# Altium PCB POD-Design-v1.0.PcbDoc (part 2 of 8)
Units mil, origin at the board's own origin, x right, y up, seen from the top; angles counter-clockwise.
Board outline 5511.81 x 3937.01 mil, 4 copper layers (Top Layer, Layer 1, Layer 2, Bottom Layer), stack 61.653 mil thick; 347 components, 252 nets, 1015 pads, 412 vias.
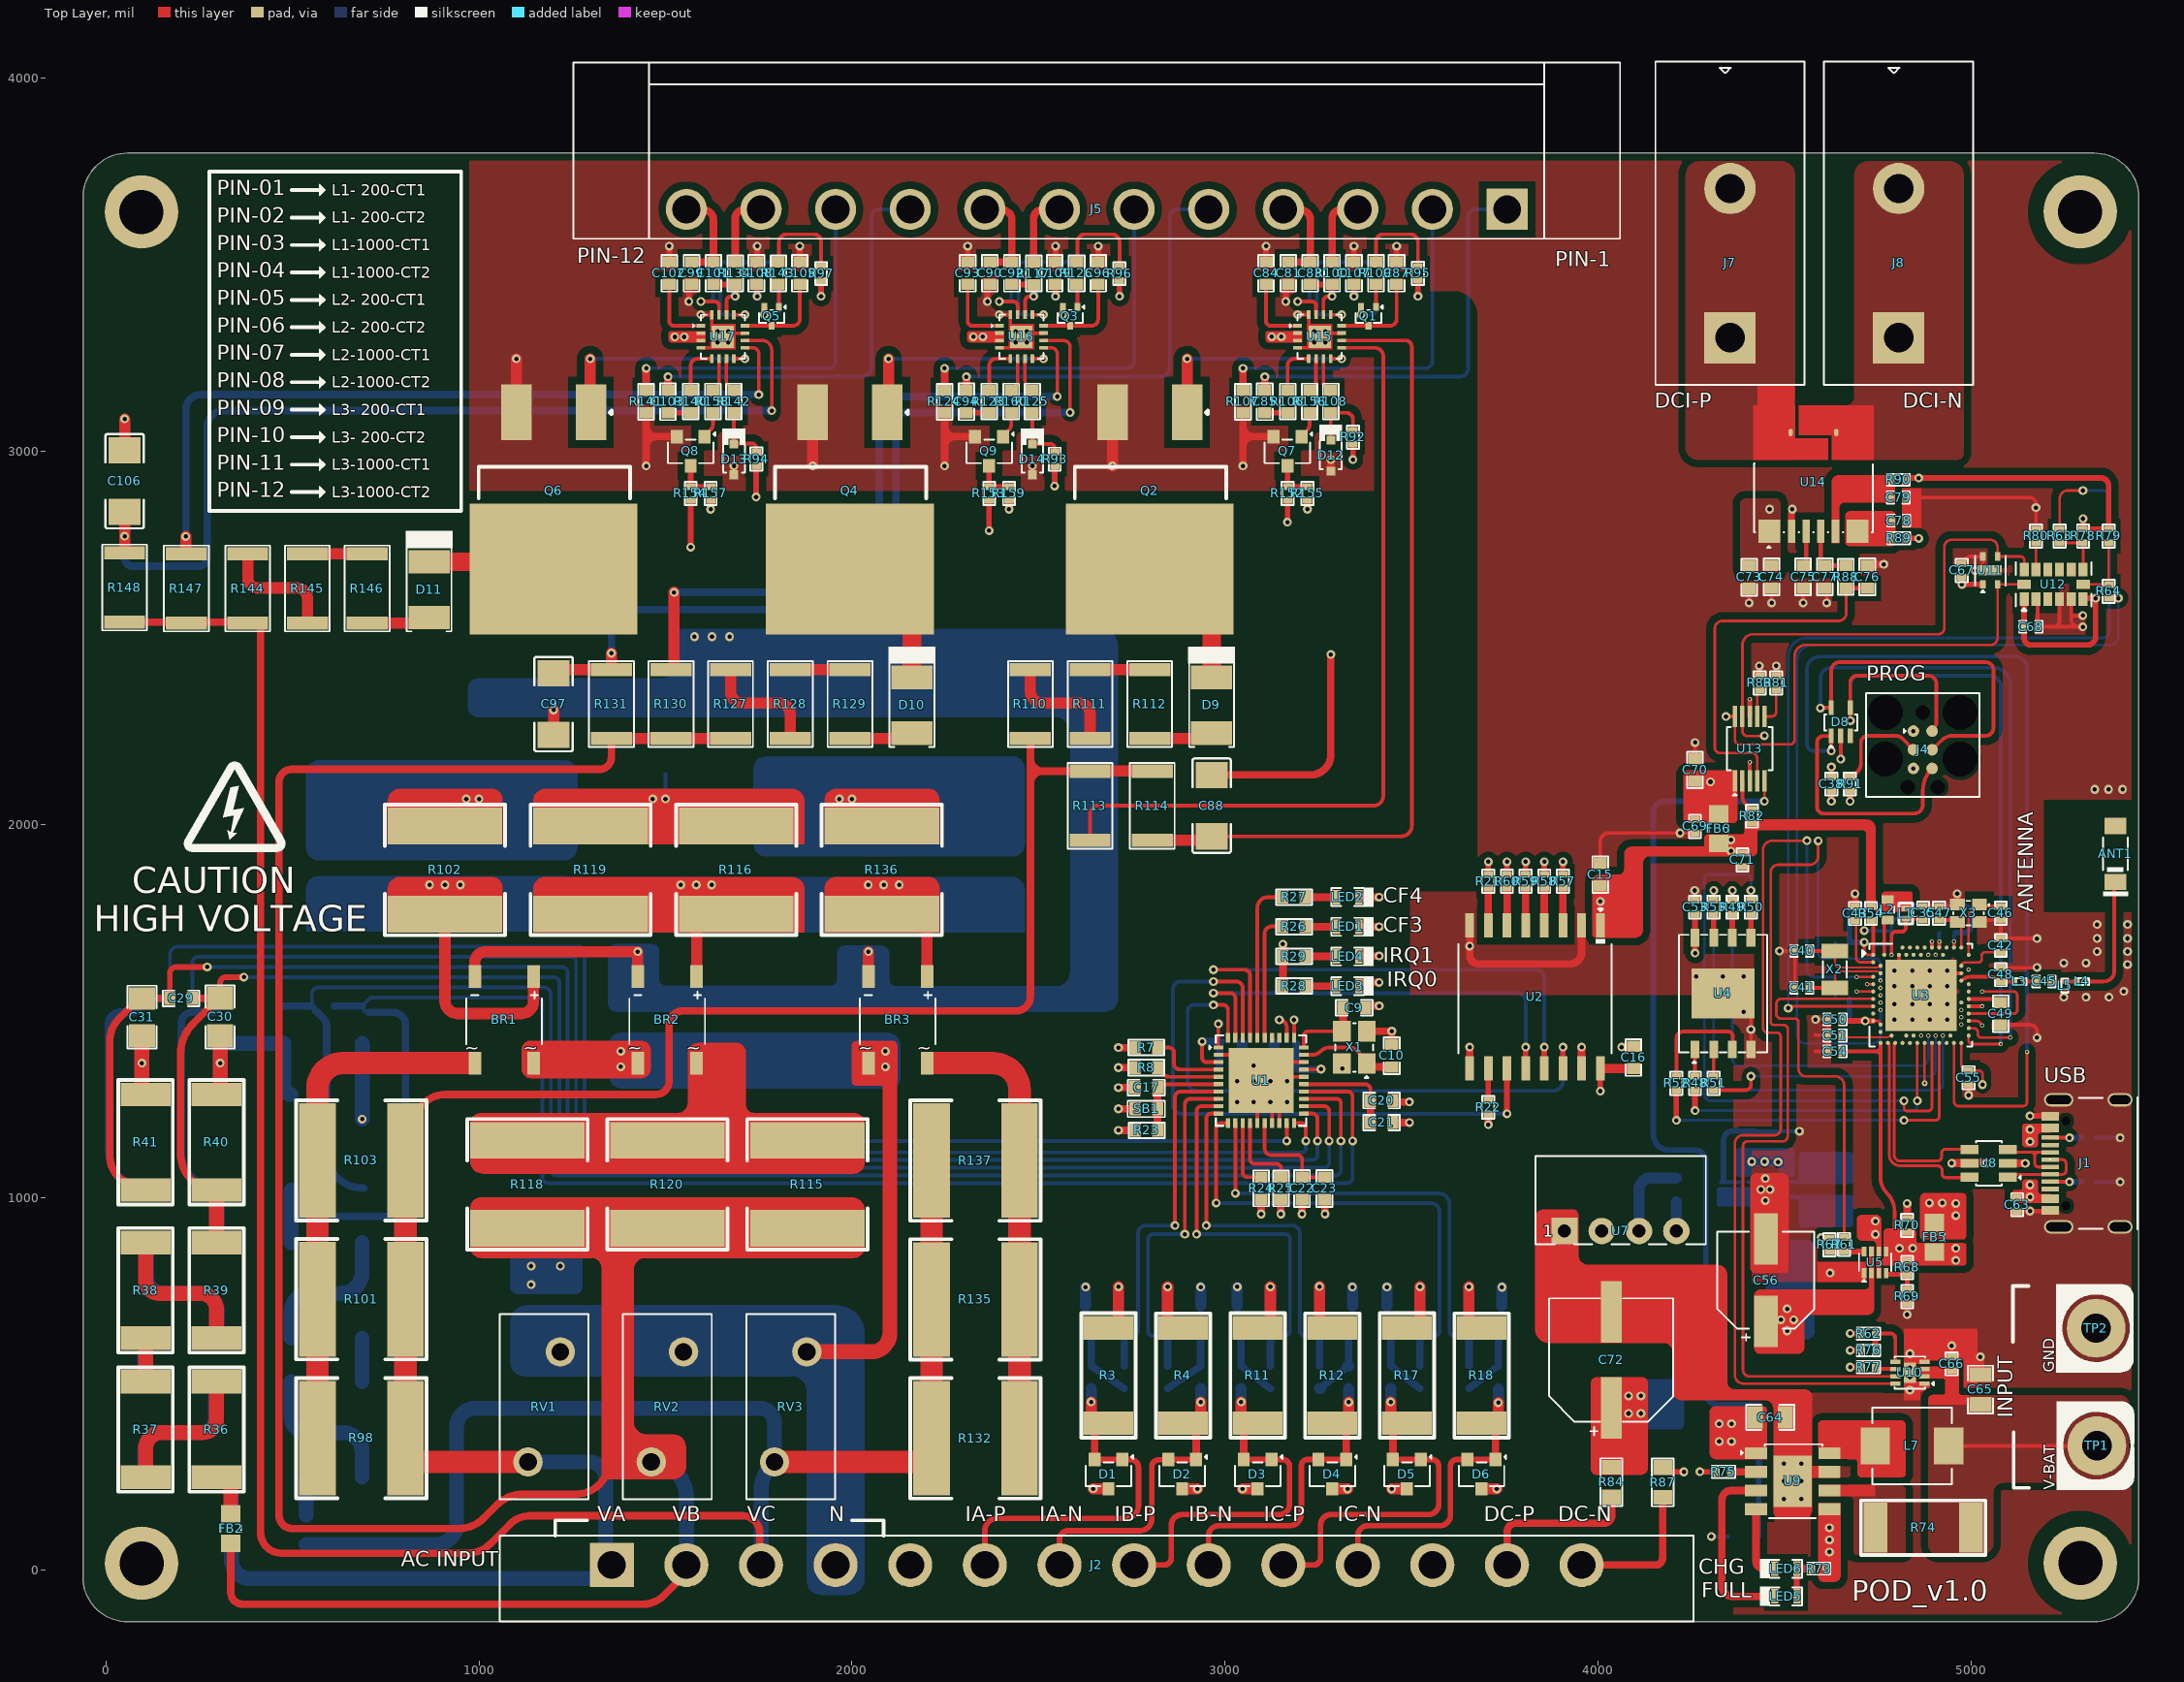
[diagram p0: Top Layer view]

## Part data (continued)
C35 C38: library part CC0402KRX5R7BB105, "CAP CER 1UF 16V X5R 0402", Case Code (Imperial)=0402, Case Code (Metric)=1005, Dielectric=X5R, LCSC Part Number=C325464, Manufacturer=Yageo, Max Operating Temperature=85°C, Min Operating Temperature=-55°C, Supplier Part Number 1=311-1691-6-ND, Tolerance=10%, Voltage Rating=16V, Capacitance=1uF, Case/Package=0402, ComponentLink1Description=http://www.yageo.com/documents/recent/UPY-GPHC_X5R_4V-to-50V_12.pdf?src-supplier=Avnet+Europe, ComponentLink1URL=http://www.yageo.com/documents/recent/UPY-GPHC_X5R_4V-to-50V_12.pdf?src-supplier=Avnet+Europe, Composition=Ceramic, Depth=0.5mm, Halogen Free="Halogen Free", Height=0.5mm, Item Type=Capacitor, Lead Free="Lead Free", Length=1mm, Manufacturer Part Number=CC0402KRX5R7BB105, Mount="Surface Mount", Packaging="Tape and Reel", Pricing 1="1=0.36, 10=0.252, 100=0.1512, 500=0.1134, 1000=0.09576, 2500=0.09072, 5000=0.08568 (USD)", Radiation Hardening=No, Stock 1=1405667, Supplier 1=Digi-Key, Termination=SMD/SMT, Thickness=0.022inch, Voltage Rating (DC)=16V, Weight=2.3E-05oz, Width=0.02inch
C36: library part CC0402KRX7R9BB473, "CAP CER 0.047UF 50V X7R 0402", Case Code (Imperial)=0402, Case Code (Metric)=1005, Dielectric=1511DielectricType, LCSC Part Number=C272875, Manufacturer=Yageo, Max Operating Temperature=125°C, Min Operating Temperature=-55°C, Supplier Part Number=2095687, Temperature Coefficient=30ppm/°C, Tolerance=10%, Voltage Rating=50V, Case/Package=0402, Category="Ceramic Capacitors", ComponentLink1Description=https://datasheet.octopart.com/CC0402KRX7R9BB473-Yageo-datasheet-166511530.pdf?src-supplier=Future+Electronics, ComponentLink1URL=https://datasheet.octopart.com/CC0402KRX7R9BB473-Yageo-datasheet-166511530.pdf?src-supplier=Future+Electronics, ComponentLink2Description=http://www.yageo.com/documents/recent/UPY-GPHC_X7R_6.3V-to-50V_18.pdf?src-supplier=Digikey, ComponentLink2URL=http://www.yageo.com/documents/recent/UPY-GPHC_X7R_6.3V-to-50V_18.pdf?src-supplier=Digikey, ComponentLink3Description=https://datasheet.octopart.com/CC0402KRX7R9BB473-Yageo-datasheet-140260305.pdf?src-supplier=Newark, ComponentLink3URL=https://datasheet.octopart.com/CC0402KRX7R9BB473-Yageo-datasheet-140260305.pdf?src-supplier=Newark, Halogen Free=5694HalogenFree, Height=550um, Item Type=Capacitor, Lead Free=5697LeadFree, Length=0.039inch, Manufacturer Part Number=CC0402KRX7R9BB473, Material=4241ConductorMaterial, Mounting Technology="Surface Mount", Packaging="Tape and Reel", Pricing="10000=0.0044, 40000=0.0042, 100000=0.004, 150000=0.0041, 250000=0.0039, 400000=0.0037, 500000=0.0038 (USD)", RoHS=Yes, RoHS Compliant=Yes, Series=CC, Stock=1130000, Supplier="Future Electronics", Thickness=0.022inch, Voltage Rating (DC)=50V, Width=0.02inch
C37 C39 C43 C44 C52 C53 C55 C60 C67 C69 C71: library part CC0402KRX7R7BB104, "CAP CER 0.1UF 16V X7R 0402", Case Code (Imperial)=0402, Case Code (Metric)=1005, Dielectric=X7R, LCSC Part Number=C60474, Manufacturer=Yageo, Max Operating Temperature=125°C, Min Operating Temperature=-55°C, Package Quantity=1, Temperature Coefficient=30ppm/°C, Tolerance=10%, Voltage=16V, Case/Package=0402, ComponentLink1Description=https://datasheet.ciiva.com/11788/0900766b80ce67ed-11788364.pdf?src-supplier=Rs, ComponentLink1URL=https://datasheet.ciiva.com/11788/0900766b80ce67ed-11788364.pdf?src-supplier=Rs, ComponentLink2Description=https://datasheet.ciiva.com/7978/1489800-7978111.pdf?src-supplier=Element14, ComponentLink2URL=https://datasheet.ciiva.com/7978/1489800-7978111.pdf?src-supplier=Element14, ComponentLink3Description=https://datasheet.ciiva.com/161/mlccorderingcode-161545.pdf?src-supplier=Digikey, ComponentLink3URL=https://datasheet.ciiva.com/161/mlccorderingcode-161545.pdf?src-supplier=Digikey, ComponentLink4Description=https://datasheet.ciiva.com/161/mlccorderingcode-161544.pdf?src-supplier=Digikey, ComponentLink4URL=https://datasheet.ciiva.com/161/mlccorderingcode-161544.pdf?src-supplier=Digikey, ComponentLink5Description=https://datasheet.ciiva.com/161/mlccorderingcode-161546.pdf?src-supplier=Digikey, ComponentLink5URL=https://datasheet.ciiva.com/161/mlccorderingcode-161546.pdf?src-supplier=Digikey, ComponentLink6Description=https://datasheet.ciiva.com/8033/1734573-8033661.pdf?src-supplier=Element14, ComponentLink6URL=https://datasheet.ciiva.com/8033/1734573-8033661.pdf?src-supplier=Element14, ComponentLink7Description=https://datasheet.ciiva.com/28450/1489800-28450335.pdf?src-supplier=Element14, ComponentLink7URL=https://datasheet.ciiva.com/28450/1489800-28450335.pdf?src-supplier=Element14, ComponentLink8Description=https://datasheet.ciiva.com/13395/upy-gphc-x7r-6-3v-to-50v-8-13395676.pdf?src-supplier=Mouser, ComponentLink8URL=https://datasheet.ciiva.com/13395/upy-gphc-x7r-6-3v-to-50v-8-13395676.pdf?src-supplier=Mouser, ComponentLink9Description=https://datasheet.ciiva.com/8033/1734573-8033663.pdf?src-supplier=Element14, ComponentLink9URL=https://datasheet.ciiva.com/8033/1734573-8033663.pdf?src-supplier=Element14, ComponentLink10Description=https://datasheet.ciiva.com/11587/upy-gphc-x7r-6-3v-to-50v-8-11587305.pdf?src-supplier=Avnet, ComponentLink10URL=https://datasheet.ciiva.com/11587/upy-gphc-x7r-6-3v-to-50v-8-11587305.pdf?src-supplier=Avnet, Depth=0.5mm, Halogen Free=5694HalogenFree, Height=0.5mm, Item Type=Capacitors, Lead Free=5697LeadFree, Length=1mm, Manufacturer Part Number=CC0402KRX7R7BB104, Material=4241ConductorMaterial, Mounting Technology="Surface Mount", Packaging="Tape and Reel", Pins=2, Pricing="10000=0.0021, 40000=0.002, 150000=0.0019, 250000=0.0019, 500000=0.0018 (USD)", Radiation Hardening=No, Reach SVHC Compliant=No, RoHS=Yes, RoHS Compliant=Yes, Series=CC, Stock=22130000, Supplier="Future Electronics", Termination=SMD/SMT, Thickness=0.022inch, Voltage Rating=16V, Voltage Rating (AC)=16V, Voltage Rating (DC)=16V, Width=0.02inch
C40 C41: library part CC0402CRNPO9BN6R8, "CAP CER 6.8PF 50V C0G/NPO 0402", Case Code (Imperial)=0402, Case Code (Metric)=1005, Dielectric=C0G, Insulation Resistance=10GR, LCSC Part Number=C189470, Manufacturer=Yageo, Max Operating Temperature=125°C, Min Operating Temperature=-55°C, Supplier Part Number=3247368, Tolerance=2%, Voltage Rating=50V, Case/Package=0402, Category="Ceramic Capacitors", ComponentLink1Description=https://datasheet.ciiva.com/11587/upy-gp-np0-16v-to-50v-8-11587182.pdf?src-supplier=Avnet, ComponentLink1URL=https://datasheet.ciiva.com/11587/upy-gp-np0-16v-to-50v-8-11587182.pdf?src-supplier=Avnet, Construction=Flat, Depth=0.5mm, Height=0.5mm, Item Type=Capacitor, Length=1mm, Manufacturer Part Number=CC0402CRNPO9BN6R8, Mounting Technology="Surface Mount", Packaging="Tape and Reel", Pricing="10000=0.0024, 40000=0.0022, 150000=0.0021, 400000=0.002, 1000000=0.0019 (USD)", Radiation Hardening=No, RoHS=Yes, RoHS Compliant=Yes, Series=CC, Stock=200000, Supplier="Future Electronics", Termination=SMD/SMT, Voltage Rating (DC)=50V, Weight=2.3E-05oz, Width=0.5mm
C42: library part CC0402JRNPO9BN101, "CAP CER 100PF 50V C0G/NPO 0402", Case Code (Imperial)=0402, Case Code (Metric)=1005, Dielectric=C0G, Dielectric Material=Ceramic, Insulation Resistance=100GR, LCSC Part Number=C106200, Manufacturer=Yageo, Max Operating Temperature=125°C, Min Operating Temperature=-55°C, Package Quantity=1, Supplier Part Number=8934564, Temperature Coefficient=30ppm/°C, Tolerance=5%, Voltage=50V, Case/Package=0402, Category="Ceramic Capacitors", ComponentLink1Description=https://datasheet.ciiva.com/11786/0900766b80d84fbf-11786101.pdf?src-supplier=Rs, ComponentLink1URL=https://datasheet.ciiva.com/11786/0900766b80d84fbf-11786101.pdf?src-supplier=Rs, ComponentLink2Description=https://datasheet.ciiva.com/23767/25787-23767888.pdf?src-supplier=Newark, ComponentLink2URL=https://datasheet.ciiva.com/23767/25787-23767888.pdf?src-supplier=Newark, ComponentLink3Description=https://datasheet.ciiva.com/28450/1443161-28450220.pdf?src-supplier=Element14, ComponentLink3URL=https://datasheet.ciiva.com/28450/1443161-28450220.pdf?src-supplier=Element14, ComponentLink4Description=https://datasheet.ciiva.com/8033/1443161-8033598.pdf?src-supplier=Element14, ComponentLink4URL=https://datasheet.ciiva.com/8033/1443161-8033598.pdf?src-supplier=Element14, ComponentLink5Description=https://datasheet.ciiva.com/143/mlccorderingcode-143990.pdf?src-supplier=Digi-Key, ComponentLink5URL=https://datasheet.ciiva.com/143/mlccorderingcode-143990.pdf?src-supplier=Digi-Key, ComponentLink6Description=https://datasheet.ciiva.com/143/mlccorderingcode-143989.pdf?src-supplier=Digi-Key, ComponentLink6URL=https://datasheet.ciiva.com/143/mlccorderingcode-143989.pdf?src-supplier=Digi-Key, ComponentLink7Description=https://datasheet.ciiva.com/143/mlccorderingcode-143991.pdf?src-supplier=Digi-Key, ComponentLink7URL=https://datasheet.ciiva.com/143/mlccorderingcode-143991.pdf?src-supplier=Digi-Key, Depth=0.5mm, Height=0.5mm, Item Type=Capacitor, Lead Free="Lead Free", Length=1mm, Manufacturer Part Number=CC0402JRNPO9BN101, Mounting Technology="Surface Mount", Packaging="Tape and Reel", Pins=2, Pricing="10000=0.002, 40000=0.0019, 150000=0.0018, 400000=0.0018, 1000000=0.0017 (USD)", Radiation Hardening=No, Reach SVHC Compliant=No, RoHS=Yes, RoHS Compliant=Yes, Series=CC, Stock=11720000, Supplier="Future Electronics", Termination=SMD/SMT, Thickness=0.022inch, Voltage Rating=50V, Voltage Rating (DC)=50V, Width=0.02inch
C45: library part GRM1555C1H2R2BA01D, "CAP CER 2.2PF 50V C0G/NP0 0402", Case Code (Imperial)=0402, Case Code (Metric)=1005, Dielectric=C0G, LCSC Part Number=C88927, Manufacturer=Murata, Max Operating Temperature=125°C, Min Operating Temperature=-55°C, Package Quantity=1, Temperature Coefficient=30ppm/°C, Voltage=50V, Case/Package=0402, Category="Ceramic Capacitors", ComponentLink1Description=https://datasheet.ciiva.com/6270/grm1555c1h2r1wa01-01-6270869.pdf?src-supplier=Digi-Key, ComponentLink1URL=https://datasheet.ciiva.com/6270/grm1555c1h2r1wa01-01-6270869.pdf?src-supplier=Digi-Key, ComponentLink2Description=https://datasheet.ciiva.com/18184/getdatasheetpartid-316203-18184296.pdf?src-supplier=Verical, ComponentLink2URL=https://datasheet.ciiva.com/18184/getdatasheetpartid-316203-18184296.pdf?src-supplier=Verical, ComponentLink3Description=https://datasheet.ciiva.com/16440/c02e-16440539.pdf?src-supplier=Future+Electronics, ComponentLink3URL=https://datasheet.ciiva.com/16440/c02e-16440539.pdf?src-supplier=Future+Electronics, ComponentLink4Description=https://datasheet.ciiva.com/6270/partnumbering-e-01-6270873.pdf?src-supplier=Digi-Key, ComponentLink4URL=https://datasheet.ciiva.com/6270/partnumbering-e-01-6270873.pdf?src-supplier=Digi-Key, ComponentLink5Description=https://datasheet.ciiva.com/6270/partnumbering-e-01-6270877.pdf?src-supplier=Digi-Key, ComponentLink5URL=https://datasheet.ciiva.com/6270/partnumbering-e-01-6270877.pdf?src-supplier=Digi-Key, ComponentLink6Description=https://datasheet.ciiva.com/11615/product-11615030.pdf?src-supplier=Avnet, ComponentLink6URL=https://datasheet.ciiva.com/11615/product-11615030.pdf?src-supplier=Avnet, Construction=Flat, Depth=0.5mm, Height=0.5mm, Item Type=Capacitor, Lead Free="Lead Free", Length=1mm, Manufacturer Part Number=GRM1555C1H2R2BA01D, Material=Ceramic, Mounting Technology="Surface Mount", Packaging="Tape and Reel", Pricing="10000=0.00887, 20000=0.00867, 40000=0.00847 (USD)", Radiation Hardening=No, Reach SVHC Compliant=No, RoHS=Yes, RoHS Compliant=Yes, Series=GRM, Stock=110000, Supplier=Avnet, Supplier Part Number=GRM1555C1H2R2BA01D, Termination=SMD/SMT, Thickness=0.022inch, Voltage Rating=50V, Voltage Rating (DC)=50V, Width=0.5mm
C46 C47: library part 0402CG9R0C500NT, "50V 9pF C0G 0402 Multilayer Ceramic Capacitors MLCC - SMD/SMT ROHS", LCSC Part Number=C1580, Manufacturer="FH (Guangdong Fenghua Advanced Tech)", Package=0402, ComponentLink1Description=LCSC, ComponentLink1URL=https://www.lcsc.com/product-detail/Multilayer-Ceramic-Capacitors-MLCC-SMD-SMT_FH-Guangdong-Fenghua-Advanced-Tech-0402CG9R0C500NT_C1580.html, Item Type=Capacitor, Manufacturer Part Number=0402CG9R0C500NT
C48: library part CC0402BRNPO9BNR80, "CAP CER 0.8PF 50V C0G/NPO 0402", Case Code (Imperial)=0402, Case Code (Metric)=1005, Dielectric=C0G, LCSC Part Number=C327032, Manufacturer=Yageo, Max Operating Temperature=125°C, Min Operating Temperature=-55°C, Supplier Part Number=4783825, Voltage Rating=50V, Case/Package=0402, Category="Ceramic Capacitors", ComponentLink1Description=http://www.mouser.com/ds/2/447/Yageo_UPY-GP_NP0_16V-to-50V_9-358835.pdf?src-supplier=Mouser, ComponentLink1URL=http://www.mouser.com/ds/2/447/Yageo_UPY-GP_NP0_16V-to-50V_9-358835.pdf?src-supplier=Mouser, ComponentLink2Description=https://datasheet.octopart.com/CC0402BRNPO9BNR80-Yageo-datasheet-151948684.pdf?src-supplier=Newark, ComponentLink2URL=https://datasheet.octopart.com/CC0402BRNPO9BNR80-Yageo-datasheet-151948684.pdf?src-supplier=Newark, ComponentLink3Description=http://www.yageo.com/documents/recent/UPY-GP_NP0_16V-to-50V_16.pdf?src-supplier=Digikey, ComponentLink3URL=http://www.yageo.com/documents/recent/UPY-GP_NP0_16V-to-50V_16.pdf?src-supplier=Digikey, ComponentLink4Description=https://www.yageo.com/upload/media/product/productsearch/datasheet/mlcc/UPY-GP_NP0_16V-to-50V_18.pdf?src-supplier=Digikey, ComponentLink4URL=https://www.yageo.com/upload/media/product/productsearch/datasheet/mlcc/UPY-GP_NP0_16V-to-50V_18.pdf?src-supplier=Digikey, ComponentLink5Description=https://datasheet.octopart.com/CC0402BRNPO9BNR80-Yageo-datasheet-151948684.pdf?src-supplier=Farnell, ComponentLink5URL=https://datasheet.octopart.com/CC0402BRNPO9BNR80-Yageo-datasheet-151948684.pdf?src-supplier=Farnell, ComponentLink6Description=https://datasheet.octopart.com/CC0402BRNPO9BNR80-Yageo-datasheet-137875056.pdf?src-supplier=Future+Electronics, ComponentLink6URL=https://datasheet.octopart.com/CC0402BRNPO9BNR80-Yageo-datasheet-137875056.pdf?src-supplier=Future+Electronics, Halogen Free=5694HalogenFree, Item Type=Capacitor, Lead Free=5697LeadFree, Length=0.039inch, Manufacturer Part Number=CC0402BRNPO9BNR80, Mounting Technology="Surface Mount", Packaging="Tape and Reel", Pricing="10000=0.0034, 40000=0.0032, 150000=0.0031, 250000=0.003, 500000=0.0028 (USD)", RoHS=Yes, RoHS Compliant=Yes, Series=CC, Stock=70000, Supplier="Future Electronics", Termination=SMD/SMT, Thickness=0.022inch, Voltage Rating (DC)=50V, Weight=2.3E-05oz, Width=0.02inch
C49: library part CC0603JRNPO9BN821, "CAP CER 820PF 50V C0G/NPO 0603", Case Code (Imperial)=0603, Case Code (Metric)=1608, Dielectric=C0G, LCSC Part Number=C107057, Manufacturer=Yageo, Max Operating Temperature=125°C, Min Operating Temperature=-55°C, Tolerance=5%, Voltage Rating=50V, Case/Package=0603, ComponentLink1Description=https://datasheet.ciiva.com/26829/getdatasheetpartid-403541-26829388.pdf?src-supplier=Verical, ComponentLink1URL=https://datasheet.ciiva.com/26829/getdatasheetpartid-403541-26829388.pdf?src-supplier=Verical, Depth=0.8mm, Height=0.8mm, Item Type=Capacitors, Lead Free="Lead Free", Length=1.6mm, Manufacturer Part Number=CC0603JRNPO9BN821, Mounting Technology="Surface Mount", Packaging="Tape and Reel", Pins=2, Pricing="4000=0.0129, 24000=0.0087, 48000=0.0086 (USD)", Radiation Hardening=No, RoHS=Yes, RoHS Compliant=Yes, Series=CC, Stock=772000, Supplier="Arrow Electronics", Termination=SMD/SMT, Thickness=0.035inch, Voltage Rating (DC)=50V, Width=0.031inch
C50 C51 C54: library part CL05A475MO5NUNC, "CAP CER 4.7UF 16V X5R 0402", Case Code (Imperial)=0402, Case Code (Metric)=1005, Manufacturer=Samsung, Max Operating Temperature=85°C, Min Operating Temperature=-55°C, Tolerance=20%, Voltage Rating=16V, Capacitance=4.7uF, Case/Package=0402, Category="Ceramic Capacitors", ComponentLink1Description=http://www.farnell.com/datasheets/2710653.pdf?src-supplier=Farnell, ComponentLink1URL=http://www.farnell.com/datasheets/2710653.pdf?src-supplier=Farnell, ComponentLink2Description=http://www.samsungsem.com/kr/support/product-search/mlcc/CL05A475MO5NUNC.jsp?src-supplier=Digikey, ComponentLink2URL=http://www.samsungsem.com/kr/support/product-search/mlcc/CL05A475MO5NUNC.jsp?src-supplier=Digikey, ComponentLink3Description=http://www.farnell.com/datasheets/2710653.pdf?src-supplier=Element14, ComponentLink3URL=http://www.farnell.com/datasheets/2710653.pdf?src-supplier=Element14, ComponentLink4Description=https://datasheet.octopart.com/CL05A475MO5NUNC-Samsung-Electro-Mechanics-datasheet-123102911.pdf?src-supplier=Future+Electronics, ComponentLink4URL=https://datasheet.octopart.com/CL05A475MO5NUNC-Samsung-Electro-Mechanics-datasheet-123102911.pdf?src-supplier=Future+Electronics, ComponentLink5Description=http://www.farnell.com/datasheets/2710653.pdf?src-supplier=Newark, ComponentLink5URL=http://www.farnell.com/datasheets/2710653.pdf?src-supplier=Newark, Height=550um, Length=0.039inch, Manufacturer Part Number=CL05A475MO5NUNC, Material=4241ConductorMaterial, Mount="Surface Mount", Packaging="Cut Tape", Pricing 1="10000=0.09712 (USD)", RoHS=Yes, RoHS Compliant=Yes, Series=CL, Stock 1=50000, Supplier 1=Avnet, Supplier Part Number 1=CL05A475MO5NUNC, Thickness=0.022inch, Voltage Rating (DC)=16V, Width=0.02inch
C56: library part 20SVPF120M, "CAP ALUM POLY 120UF 20% 20V SMD", Case/Package=Radial, ESR (Equivalent Series Resistance)=25mR, LCSC Part Number=C186713, Leakage Current=480uA, Manufacturer=Panasonic, Max Operating Temperature=105°C, Min Operating Temperature=-55°C, Package Quantity=1000, Ripple Current=3.2A, Supplier Part Number 1=P16498CT-ND, Tolerance=20%, Voltage=20V, Capacitance=120uF, Category="Aluminum Electrolytic Capacitors", ComponentLink1Description=https://datasheet.ciiva.com/24432/svpf-series-datasheet-24432811.pdf?src-supplier=Onlinecomponents.com, ComponentLink1URL=https://datasheet.ciiva.com/24432/svpf-series-datasheet-24432811.pdf?src-supplier=Onlinecomponents.com, ComponentLink2Description=https://datasheet.ciiva.com/25746/1734360-25746680.pdf?src-supplier=Farnell, ComponentLink2URL=https://datasheet.ciiva.com/25746/1734360-25746680.pdf?src-supplier=Farnell, ComponentLink3Description=https://datasheet.ciiva.com/22746/1734360-22746206.pdf?src-supplier=Element14, ComponentLink3URL=https://datasheet.ciiva.com/22746/1734360-22746206.pdf?src-supplier=Element14, ComponentLink4Description=https://datasheet.ciiva.com/46650/70324301-46650876.pdf?src-supplier=Allied+Electronics, ComponentLink4URL=https://datasheet.ciiva.com/46650/70324301-46650876.pdf?src-supplier=Allied+Electronics, Construction=Cylindrical, Diameter=6.3mm, Dissipation Factor=12%, Height=5.9mm, Height - Seated (Max)=0.236inch, Item Type=Capacitor, Lead Free="Lead Free", Length=5.9mm, Life (Hours)=5000Hour, Manufacturer Part Number=20SVPF120M, Material=Polymer, Mount="Surface Mount", Number of Pins=6, Packaging="Tape and Reel", Polarity=Polar, Pricing 1="1=1.45000, 10=1.14300, 50=0.99020, 100=0.85700, 500=0.64748 (USD)", Radiation Hardening=No, Reach SVHC Compliant=Yes, Ripple Current (AC)=3.2A, RoHS=Yes, RoHS Compliant=Yes, Series="OS-CON™, SVPF", Stock 1=50150, Supplier 1=Digi-Key, Termination=SMD/SMT, Voltage Rating=20V, Voltage Rating (DC)=20V
C57 C58 C59 C61 C62 C70 C73: library part GRM188Z71A106KA73D, "CAP CER 10UF 10V X7R 0603", Case/Package=345Case, LCSC Part Number=C2959727, Manufacturer=Murata, Max Operating Temperature=125°C, Min Operating Temperature=-55°C, Tolerance=10%, Voltage Rating=10V, ComponentLink1Description=https://datasheet.octopart.com/GRM188Z71A106KA73D-Murata-datasheet-165579666.pdf?src-supplier=TME, ComponentLink1URL=https://datasheet.octopart.com/GRM188Z71A106KA73D-Murata-datasheet-165579666.pdf?src-supplier=TME, Height=1mm, Item Type=Capacitor, Length=1.6mm, Manufacturer Part Number=GRM188Z71A106KA73D, Material=4241ConductorMaterial, Pricing="1=0.36, 10=0.155, 50=0.155, 100=0.104, 1000=0.094, 10000=0.065 (USD)", RoHS=Yes, RoHS Compliant=Yes, Stock=390983, Supplier=Mouser, Thickness=800um, Width=800um
C63 C68: library part CC0402JRX7R7BB104, "CAP CER 0.1UF 16V X7R 0402", Case Code (Imperial)=0402, Case Code (Metric)=1005, Dielectric=X7R, LCSC Part Number=C541464, Manufacturer=Yageo, Max Operating Temperature=125°C, Min Operating Temperature=-55°C, Package Quantity=10000, Supplier Part Number=311-1676-1-ND, Tolerance=5%, Voltage Rating=16V, Case/Package=0402, Category="Ceramic Capacitors", ComponentLink1Description=https://datasheet.ciiva.com/13210/upy-gphc-x7r-6-3v-to-50v-8-12304-13210152.pdf?src-supplier=Mouser, ComponentLink1URL=https://datasheet.ciiva.com/13210/upy-gphc-x7r-6-3v-to-50v-8-12304-13210152.pdf?src-supplier=Mouser, Construction=Flat, Halogen Free="Halogen Free", Height=0.5mm, Item Type=Capacitor, Lead Free="Lead Free", Length=0.039inch, Manufacturer Part Number=CC0402JRX7R7BB104, Material=4241ConductorMaterial, Mounting Technology="Surface Mount", Packaging="Tape and Reel", Pricing="1=0.1, 10=0.046, 50=0.0262, 100=0.0203, 500=0.01528, 1000=0.012, 2500=0.01091, 5000=0.01004 (USD)", RoHS=Yes, RoHS Compliant=Yes, Series=CC, Stock=1659111, Supplier=Digikey, Thickness=0.022inch, Voltage Rating (DC)=16V, Width=0.02inch
C64 C65: library part GRM21BZ71A226ME15L, "CAP CER 22UF 10V X7R 0805", LCSC Part Number=C907991, Manufacturer=Murata, Max Operating Temperature=125°C, Min Operating Temperature=-55°C, Package=0805, Supplier Part Number=490-GRM21BZ71A226ME15LCT-ND, Tolerance=20%, Voltage Rating=10V, Category="Ceramic Capacitors", ComponentLink1Description=https://datasheet.octopart.com/GRM21BZ71A226ME15L-Murata-datasheet-165579666.pdf?src-supplier=TME, ComponentLink1URL=https://datasheet.octopart.com/GRM21BZ71A226ME15L-Murata-datasheet-165579666.pdf?src-supplier=TME, ComponentLink2Description=LCSC, ComponentLink2URL=https://www.lcsc.com/product-detail/Multilayer-Ceramic-Capacitors-MLCC-SMD-SMT_Murata-Electronics-GRM21BZ71A226ME15L_C907991.html, Height=1.45mm, Item Type=Capacitor, Length=2mm, Manufacturer Part Number=GRM21BZ71A226ME15L, Material=4241ConductorMaterial, Pricing="1=0.39, 10=0.259, 50=0.191, 100=0.1556, 500=0.12282, 1000=0.10372 (USD)", RoHS=Yes, Stock=49126, Supplier=Digi-Key, Thickness=1.25mm, Width=1.25mm
C66: library part GRM155R70J105KA12J, "CAP CER 1UF 6.3V X7R 0402", Case Code (Imperial)=0402, Case Code (Metric)=1005, Dielectric=X7R, LCSC Part Number=C2167130, Manufacturer=Murata, Max Operating Temperature=125°C, Min Operating Temperature=-55°C, Package Quantity=50000, Tolerance=10%, Voltage Rating=6.3V, Case/Package=0402, ComponentLink1Description=http://www.mouser.com/ds/2/281/c02e-2905.pdf?src-supplier=Mouser, ComponentLink1URL=http://www.mouser.com/ds/2/281/c02e-2905.pdf?src-supplier=Mouser, ComponentLink2Description=https://datasheet.octopart.com/GRM155R70J105KA12J-Murata-datasheet-32479577.pdf?src-supplier=Future+Electronics, ComponentLink2URL=https://datasheet.octopart.com/GRM155R70J105KA12J-Murata-datasheet-32479577.pdf?src-supplier=Future+Electronics, ComponentLink3Description=https://datasheet.octopart.com/GRM155R70J105KA12J-Murata-datasheet-155345054.pdf?src-supplier=Element14, ComponentLink3URL=https://datasheet.octopart.com/GRM155R70J105KA12J-Murata-datasheet-155345054.pdf?src-supplier=Element14, ComponentLink4Description=http://search.murata.co.jp/Ceramy/image/img/A01X/G101/ENG/GRM155R70J105KA12-01.pdf?src-supplier=Digikey, ComponentLink4URL=http://search.murata.co.jp/Ceramy/image/img/A01X/G101/ENG/GRM155R70J105KA12-01.pdf?src-supplier=Digikey, ComponentLink5Description=https://datasheet.octopart.com/GRM155R70J105KA12J-Murata-datasheet-165579666.pdf?src-supplier=TME, ComponentLink5URL=https://datasheet.octopart.com/GRM155R70J105KA12J-Murata-datasheet-165579666.pdf?src-supplier=TME, Height=550um, Item Type=Capacitors, Length=0.039inch, Manufacturer Part Number=GRM155R70J105KA12J, Material=4241ConductorMaterial, Mounting Technology="Surface Mount", Packaging="Tape and Reel", Pins=2NUMBER, Pricing="1=0.1, 10=0.01, 50=0.01, 100=0.008, 1000=0.008, 10000=0.007 (USD)", RoHS=Yes, RoHS Compliant=Yes, Series=GRM, Stock=273640, Supplier=Mouser, Termination=SMD/SMT, Thickness=0.022inch, Voltage Rating (DC)=6.3V, Weight=0.000212oz, Width=0.02inch
C72: library part UD2C100M0810, "10uF 160V ±20% SMD,D8xL10.2mm Aluminum Electrolytic Capacitors - SMD ROHS", LCSC Part Number=C88696, Manufacturer="Honor Elec", Package=SMD,D8xL10.2mm, ComponentLink1Description=LCSC, ComponentLink1URL=https://www.lcsc.com/product-detail/Aluminum-Electrolytic-Capacitors-SMD_Honor-Elec-UD2C100M0810_C88696.html, Item Type=Capacitor, Manufacturer Part Number=UD2C100M0810
C74: library part CC0603JRX7R9BB104, "CAP CER 0.1UF 50V X7R 0603", LCSC Part Number=C91183, Manufacturer=Yageo, ComponentLink1Description=https://datasheet.ciiva.com/11465/upy-gphc-x7r-6-3v-to-50v-8-11465038.pdf?src-supplier=Avnet, ComponentLink1URL=https://datasheet.ciiva.com/11465/upy-gphc-x7r-6-3v-to-50v-8-11465038.pdf?src-supplier=Avnet, Halogen Free=5694HalogenFree, Item Type=Capacitors, Lead Free=5697LeadFree, Manufacturer Part Number=CC0603JRX7R9BB104, Material=4241ConductorMaterial, Pins=2NUMBER, Pricing="4000=0.0077, 16000=0.0073, 60000=0.007, 160000=0.0068, 400000=0.0064 (USD)", RoHS=Yes, Stock=204000, Supplier="Future Electronics"
C75 C77: library part 0603B682K500NT, "50V 6.8nF X7R ±10% 0603", LCSC Part Number=C1631, Manufacturer=FH, ComponentLink1Description=LCSC, ComponentLink1URL=https://www.lcsc.com/product-detail/Multilayer-Ceramic-Capacitors-MLCC-SMD-SMT_FH-Guangdong-Fenghua-Advanced-Tech-0603B682K500NT_C1631.html, Item Type=Capacitor, Manufacturer Part Number=0603B682K500NT
C76: library part CC0603JRX7R9BB153, "CAP CER 0.015UF 50V X7R 0603", Case Code (Imperial)=0603, Case Code (Metric)=1608, Dielectric=X7R, LCSC Part Number=C519550, Manufacturer=Yageo, Max Operating Temperature=125°C, Min Operating Temperature=-55°C, Resistor Type=Ceramic, Supplier Part Number 1=8958167, Tolerance=5%, Voltage Rating=50V, Case/Package=0603, Category="Ceramic Capacitors", ComponentLink1Description=http://www.mouser.com/ds/2/447/Yageo_UPY-GP_NP0_16V-to-50V_9-358835.pdf?src-supplier=Mouser, ComponentLink1URL=http://www.mouser.com/ds/2/447/Yageo_UPY-GP_NP0_16V-to-50V_9-358835.pdf?src-supplier=Mouser, ComponentLink2Description=https://www.yageo.com/upload/media/product/productsearch/datasheet/mlcc/UPY-GPHC_X7R_6.3V-to-50V_18.pdf?src-supplier=Digi-Key, ComponentLink2URL=https://www.yageo.com/upload/media/product/productsearch/datasheet/mlcc/UPY-GPHC_X7R_6.3V-to-50V_18.pdf?src-supplier=Digi-Key, ComponentLink3Description=http://www.yageo.com/documents/recent/UPY-GPHC_X7R_6.3V-to-50V_8.pdf?src-supplier=Avnet, ComponentLink3URL=http://www.yageo.com/documents/recent/UPY-GPHC_X7R_6.3V-to-50V_8.pdf?src-supplier=Avnet, ComponentLink4Description=http://www.yageo.com/documents/recent/UPY-GPHC_X7R_6.3V-to-50V_9.pdf?src-supplier=Future+Electronics, ComponentLink4URL=http://www.yageo.com/documents/recent/UPY-GPHC_X7R_6.3V-to-50V_9.pdf?src-supplier=Future+Electronics, ComponentLink5Description=http://www.yageo.com/documents/recent/UPY-GPHC_X7R_6.3V-to-50V_16.pdf?src-supplier=Digi-Key, ComponentLink5URL=http://www.yageo.com/documents/recent/UPY-GPHC_X7R_6.3V-to-50V_16.pdf?src-supplier=Digi-Key, Construction=Flat, Depth=0.8mm, Halogen Free="Halogen Free", Height=0.8mm, Item Type=Capacitor, Lead Free="Lead Free", Length=1.6mm, Manufacturer Part Number=CC0603JRX7R9BB153, Mounting Technology="Surface Mount", Packaging="Tape and Reel", Pricing 1="4000=0.00980, 16000=0.00930, 60000=0.00890, 100000=0.00870, 200000=0.00820 (USD)", Radiation Hardening=No, RoHS=Yes, RoHS Compliant=Yes, Series=CC, Stock 1=16000, Supplier 1="Future Electronics", Termination=SMD/SMT, Thickness=0.035inch, Voltage Rating (DC)=50V, Weight=7.1E-05oz, Width=0.031inch
C78 C79: library part CC0402KRX7R8BB102, "CAP CER 1000PF 25V X7R 0402", Case Code (Imperial)=0402, Case Code (Metric)=1005, Dielectric=X7R, Insulation Resistance=10GR, LCSC Part Number=C541372, Manufacturer=Yageo, Max Operating Temperature=125°C, Min Operating Temperature=-55°C, Tolerance=10%, Voltage Rating=25V, Capacitance=1nF, Case/Package=0402, Category="Ceramic Capacitors", ComponentLink1Description=https://datasheet.ciiva.com/26862/getdatasheetpartid-639817-26862638.pdf?src-supplier=Verical, ComponentLink1URL=https://datasheet.ciiva.com/26862/getdatasheetpartid-639817-26862638.pdf?src-supplier=Verical, ComponentLink2Description=https://datasheet.ciiva.com/5425/upy-gp-np0-16v-to-50v-8-3714-5425527.pdf?src-supplier=Mouser, ComponentLink2URL=https://datasheet.ciiva.com/5425/upy-gp-np0-16v-to-50v-8-3714-5425527.pdf?src-supplier=Mouser, Depth=0.5mm, Dissipation Factor=2.5%, Halogen Free="Halogen Free", Item Type=Capacitor, Lead Free="Lead Free", Length=1mm, Manufacturer Part Number=CC0402KRX7R8BB102, Mount="Surface Mount", Number of Pins=2, Packaging="Tape and Reel", Pricing 1="1=0.00230, 10000=0.00230, 100001=0.00190 (USD)", Radiation Hardening=No, RoHS=Yes, RoHS Compliant=Yes, Series=CC, Stock 1=370000, Supplier 1="Arrow Electronics", Supplier Part Number 1=CC0402KRX7R8BB102, Termination=SMD/SMT, Thickness=0.022inch, Voltage Rating (DC)=25V, Width=0.02inch
C80 C89 C98: library part CC0603KRX5R9BB474, "CAP CER 0.47UF 50V X5R 0603", Case/Package=0603, Dielectric=X5R, LCSC Part Number=C513651, Manufacturer=Yageo, Max Operating Temperature=85°C, Min Operating Temperature=-55°C, Supplier Part Number 1=311-4047-1-ND, Tolerance=10%, Voltage Rating=50V, Capacitance=470nF, Category="Ceramic Capacitors", ComponentLink1Description="https://www.mouser.com/ds/2/447/ProductSelectionGuide 2014_Final_2-1131690.pdf?src-supplier=Mouser", ComponentLink1URL="https://www.mouser.com/ds/2/447/ProductSelectionGuide 2014_Final_2-1131690.pdf?src-supplier=Mouser", ComponentLink2Description=http://www.yageo.com/documents/recent/UPY-GPHC_X5R_4V-to-50V_25.pdf?src-supplier=Digi-Key, ComponentLink2URL=http://www.yageo.com/documents/recent/UPY-GPHC_X5R_4V-to-50V_25.pdf?src-supplier=Digi-Key, ComponentLink3Description=http://www.yageo.com/exep/pages/download/literatures/ProductSelectionGuide%202014_Final_2.pdf?src-supplier=Digi-Key, ComponentLink3URL=http://www.yageo.com/exep/pages/download/literatures/ProductSelectionGuide%202014_Final_2.pdf?src-supplier=Digi-Key, Halogen Free="Halogen Free", Item Type=Capacitor, Lead Free="Lead Free", Length=0.063inch, Manufacturer Part Number=CC0603KRX5R9BB474, Mount="Surface Mount", Packaging="Tape and Reel", Pricing 1="1=0.45000, 10=0.31400, 50=0.22000, 100=0.18860, 500=0.14144, 1000=0.11944 (USD)", RoHS=Yes, RoHS Compliant=Yes, Stock 1=15145, Supplier 1=Digi-Key, Thickness=0.035inch, Voltage Rating (DC)=50V, Width=0.031inch
C81 C90 C99: library part CC0603JRNPO9BN181, "CAP CER 180PF 50V C0G/NPO 0603", LCSC Part Number=C107041, Manufacturer=Yageo, ComponentLink1Description=https://datasheet.ciiva.com/26862/getdatasheetpartid-403527-26862762.pdf?src-supplier=Verical, ComponentLink1URL=https://datasheet.ciiva.com/26862/getdatasheetpartid-403527-26862762.pdf?src-supplier=Verical, ComponentLink2Description=https://datasheet.ciiva.com/176/mlccorderingcode-176405.pdf?src-supplier=Digikey, ComponentLink2URL=https://datasheet.ciiva.com/176/mlccorderingcode-176405.pdf?src-supplier=Digikey, ComponentLink3Description=https://datasheet.ciiva.com/176/mlccorderingcode-176406.pdf?src-supplier=Digikey, ComponentLink3URL=https://datasheet.ciiva.com/176/mlccorderingcode-176406.pdf?src-supplier=Digikey, ComponentLink4Description=https://datasheet.ciiva.com/176/mlccorderingcode-176407.pdf?src-supplier=Digikey, ComponentLink4URL=https://datasheet.ciiva.com/176/mlccorderingcode-176407.pdf?src-supplier=Digikey, ComponentLink5Description=https://datasheet.ciiva.com/5427/upy-gp-np0-16v-to-50v-8-5427755.pdf?src-supplier=Mouser, ComponentLink5URL=https://datasheet.ciiva.com/5427/upy-gp-np0-16v-to-50v-8-5427755.pdf?src-supplier=Mouser, ComponentLink6Description=https://datasheet.ciiva.com/8033/1443161-8033736.pdf?src-supplier=Element14, ComponentLink6URL=https://datasheet.ciiva.com/8033/1443161-8033736.pdf?src-supplier=Element14, ComponentLink7Description=https://datasheet.ciiva.com/8033/1443161-8033738.pdf?src-supplier=Element14, ComponentLink7URL=https://datasheet.ciiva.com/8033/1443161-8033738.pdf?src-supplier=Element14, ComponentLink8Description=https://datasheet.ciiva.com/7978/1132289-7978133.pdf?src-supplier=Element14, ComponentLink8URL=https://datasheet.ciiva.com/7978/1132289-7978133.pdf?src-supplier=Element14, Item Type=Capacitors, Manufacturer Part Number=CC0603JRNPO9BN181, Pricing="4000=0.006, 8000=0.0057, 12000=0.0056, 20000=0.0055, 40000=0.0055, 200000=0.0053 (USD)", RoHS=Yes, Stock=3012000, Supplier="Arrow Electronics"
C82 C91 C100: library part FS55X335K251EHG, "250V 3.3uF X7R ±10% 2220 Multilayer Ceramic Capacitors MLCC - SMD/SMT ROHS", LCSC Part Number=C22370027, Manufacturer="PSA(Prosperity Dielectrics)", Package=2220, ComponentLink1Description=LCSC, ComponentLink1URL=https://www.lcsc.com/product-detail/Multilayer-Ceramic-Capacitors-MLCC-SMD-SMT_PSA-Prosperity-Dielectrics-FS55X335K251EHG_C22370027.html, Item Type=Capacitor, Manufacturer Part Number=FS55X335K251EHG
C83 C84 C86 C87 C92 C93 C95 C96 C101 C102 C104 C105: library part 06031C102KAT2A, "CAP CER 1000PF 100V X7R 0603", LCSC Part Number=C2167292, Manufacturer="Kyocera AVX", ComponentLink1Description=https://datasheet.ciiva.com/5422/cx7r-218113-5422905.pdf?src-supplier=Mouser, ComponentLink1URL=https://datasheet.ciiva.com/5422/cx7r-218113-5422905.pdf?src-supplier=Mouser, ComponentLink2Description=https://datasheet.ciiva.com/11499/cx7r-11499669.pdf?src-supplier=Avnet, ComponentLink2URL=https://datasheet.ciiva.com/11499/cx7r-11499669.pdf?src-supplier=Avnet, ComponentLink3Description=https://datasheet.ciiva.com/2987/cx7r-2987733.pdf?src-supplier=Avnet, ComponentLink3URL=https://datasheet.ciiva.com/2987/cx7r-2987733.pdf?src-supplier=Avnet, ComponentLink4Description=https://datasheet.ciiva.com/150/cx7r-150395.pdf?src-supplier=Digikey, ComponentLink4URL=https://datasheet.ciiva.com/150/cx7r-150395.pdf?src-supplier=Digikey, ComponentLink5Description=https://datasheet.ciiva.com/150/cx7r-150396.pdf?src-supplier=Digikey, ComponentLink5URL=https://datasheet.ciiva.com/150/cx7r-150396.pdf?src-supplier=Digikey, ComponentLink6Description=https://datasheet.ciiva.com/150/cx7r-150397.pdf?src-supplier=Digikey, ComponentLink6URL=https://datasheet.ciiva.com/150/cx7r-150397.pdf?src-supplier=Digikey, ComponentLink7Description=https://datasheet.ciiva.com/1124/1679506-1124198.pdf?src-supplier=Element14, ComponentLink7URL=https://datasheet.ciiva.com/1124/1679506-1124198.pdf?src-supplier=Element14, ComponentLink8Description=https://datasheet.ciiva.com/22693/1679506-22693579.pdf?src-supplier=Element14, ComponentLink8URL=https://datasheet.ciiva.com/22693/1679506-22693579.pdf?src-supplier=Element14, ComponentLink9Description=https://datasheet.ciiva.com/7855/1679506-7855033.pdf?src-supplier=Element14, ComponentLink9URL=https://datasheet.ciiva.com/7855/1679506-7855033.pdf?src-supplier=Element14, ComponentLink10Description=https://datasheet.ciiva.com/7855/84526-7855189.pdf?src-supplier=Element14, ComponentLink10URL=https://datasheet.ciiva.com/7855/84526-7855189.pdf?src-supplier=Element14, ComponentLink11Description=https://datasheet.ciiva.com/16289/cx7r-16289400.pdf?src-supplier=Future+Electronics, ComponentLink11URL=https://datasheet.ciiva.com/16289/cx7r-16289400.pdf?src-supplier=Future+Electronics, ComponentLink12Description=https://datasheet.ciiva.com/14594/70001075-14594623.pdf?src-supplier=Allied+Electronics, ComponentLink12URL=https://datasheet.ciiva.com/14594/70001075-14594623.pdf?src-supplier=Allied+Electronics, ComponentLink13Description=https://datasheet.ciiva.com/14600/70001075-14600988.pdf?src-supplier=Allied+Electronics, ComponentLink13URL=https://datasheet.ciiva.com/14600/70001075-14600988.pdf?src-supplier=Allied+Electronics, Item Type=Capacitor, Lead Free=5697LeadFree, Manufacturer Part Number=06031C102KAT2A, Pricing="4000=0.0086, 8000=0.0084, 16000=0.0082, 24000=0.008, 32000=0.0079 (USD)", RoHS=Yes, Stock=656000, Supplier=Avnet
C85 C94 C103: library part CC0603KRX7R0BB104, "CAP CER 0.1UF 100V X7R 0603", Capacitance=100nF, Case Code (Imperial)=0603, Case Code (Metric)=1608, Dielectric=X7R, LCSC Part Number=C113803, Manufacturer=Yageo, Max Operating Temperature=125°C, Min Operating Temperature=-55°C, Package Quantity=4000, Resistor Type=Ceramic, Supplier Part Number 1=311-1523-1-ND, Tolerance=10%, Voltage Rating=100V, Case/Package=0603, Category="Ceramic Capacitors", ComponentLink1Description=https://datasheet.ciiva.com/6277/mlccorderingcode-6277030.pdf?src-supplier=Digi-Key, ComponentLink1URL=https://datasheet.ciiva.com/6277/mlccorderingcode-6277030.pdf?src-supplier=Digi-Key, ComponentLink2Description=https://datasheet.ciiva.com/6277/mlccorderingcode-6277081.pdf?src-supplier=Digi-Key, ComponentLink2URL=https://datasheet.ciiva.com/6277/mlccorderingcode-6277081.pdf?src-supplier=Digi-Key, ComponentLink3Description=https://datasheet.ciiva.com/6277/mlccorderingcode-6277082.pdf?src-supplier=Digi-Key, ComponentLink3URL=https://datasheet.ciiva.com/6277/mlccorderingcode-6277082.pdf?src-supplier=Digi-Key, Depth=0.8mm, Item Type=Capacitor, Lead Free="Lead Free", Length=0.063inch, Manufacturer Part Number=CC0603KRX7R0BB104, Mount="Surface Mount", Packaging="Tape and Reel", Pricing 1="1=0.19000, 10=0.13500, 50=0.07680, 100=0.06370, 500=0.04466, 1000=0.03696 (USD)", RoHS=Yes, RoHS Compliant=Yes, Series=CC, Stock 1=60476, Supplier 1=Digi-Key, Termination=SMD/SMT, Thickness=0.035inch, Voltage Rating (DC)=100V, Weight=7.1E-05oz, Width=0.031inch
C88 C97 C106: library part GR442QR73D102KW01L, "CAP CER 1000PF 2KV X7R 1808", Case Code (Imperial)=1808, Case Code (Metric)=4520, Dielectric=X7R, LCSC Part Number=C76916, Manufacturer=Murata, Max Operating Temperature=125°C, Min Operating Temperature=-55°C, Package Quantity=1, Tolerance=10%, Voltage=2kV, Case/Package=1808, ComponentLink1Description=https://datasheet.ciiva.com/11789/0900766b80ef921d-11789101.pdf?src-supplier=Rs, ComponentLink1URL=https://datasheet.ciiva.com/11789/0900766b80ef921d-11789101.pdf?src-supplier=Rs, ComponentLink2Description=https://datasheet.ciiva.com/18183/getdatasheetpartid-149668-18183889.pdf?src-supplier=Verical, ComponentLink2URL=https://datasheet.ciiva.com/18183/getdatasheetpartid-149668-18183889.pdf?src-supplier=Verical, ComponentLink3Description=https://datasheet.ciiva.com/29540/product-29540570.pdf?src-supplier=Digikey, ComponentLink3URL=https://datasheet.ciiva.com/29540/product-29540570.pdf?src-supplier=Digikey, ComponentLink4Description=https://datasheet.ciiva.com/29540/partnumbering-e-01-29540571.pdf?src-supplier=Digikey, ComponentLink4URL=https://datasheet.ciiva.com/29540/partnumbering-e-01-29540571.pdf?src-supplier=Digikey, ComponentLink5Description=https://datasheet.ciiva.com/16497/product-16497100.pdf?src-supplier=Future+Electronics, ComponentLink5URL=https://datasheet.ciiva.com/16497/product-16497100.pdf?src-supplier=Future+Electronics, Construction=Flat, Depth=2mm, Height=1.5mm, Item Type=Capacitor, Lead Free="Lead Free", Length=4.5mm, Manufacturer Part Number=GR442QR73D102KW01L, Mounting Technology="Surface Mount", Packaging="Tape and Reel", Pricing="2000=0.235, 4000=0.23, 6000=0.23, 8000=0.225, 10000=0.22 (USD)", Radiation Hardening=No, Reach SVHC Compliant=No, RoHS=Yes, RoHS Compliant=Yes, Series=GR4, Stock=2000, Supplier="Future Electronics", Termination=SMD/SMT, Thickness=0.059inch, Voltage Rating=2kV, Voltage Rating (DC)=2kV, Width=0.079inch
C107 C108 C109: library part CC0603KRX7R9BB103, "CAP CER 10000PF 50V X7R 0603", Case Code (Imperial)=0603, Case Code (Metric)=1608, Dielectric=X7R, Insulation Resistance=100GR, LCSC Part Number=C100042, Manufacturer=Yageo, Max Operating Temperature=125°C, Min Operating Temperature=-55°C, Package Quantity=1, Supplier Part Number 1=311-1085-6-ND, Tolerance=10%, Voltage=50V, Capacitance=10nF, Case/Package=0603, ComponentLink1Description=http://www.farnell.com/datasheets/1734573.pdf?src-supplier=Element14, ComponentLink1URL=http://www.farnell.com/datasheets/1734573.pdf?src-supplier=Element14, ComponentLink2Description=http://www.yageo.com/documents/recent/UPY-GPHC_X7R_6.3V-to-50V_18.pdf?src-supplier=Digi-Key, ComponentLink2URL=http://www.yageo.com/documents/recent/UPY-GPHC_X7R_6.3V-to-50V_18.pdf?src-supplier=Digi-Key, ComponentLink3Description=http://www.farnell.com/datasheets/2167236.pdf?src-supplier=Mouser, ComponentLink3URL=http://www.farnell.com/datasheets/2167236.pdf?src-supplier=Mouser, ComponentLink4Description=http://www.farnell.com/datasheets/70765.pdf?src-supplier=Element14, ComponentLink4URL=http://www.farnell.com/datasheets/70765.pdf?src-supplier=Element14, ComponentLink5Description=http://www.yageo.com/documents/recent/UPY-GPHC_X7R_6.3V-to-50V_8.pdf?src-supplier=Avnet+Europe, ComponentLink5URL=http://www.yageo.com/documents/recent/UPY-GPHC_X7R_6.3V-to-50V_8.pdf?src-supplier=Avnet+Europe, ComponentLink6Description=http://www.farnell.com/datasheets/1489800.pdf?src-supplier=Element14, ComponentLink6URL=http://www.farnell.com/datasheets/1489800.pdf?src-supplier=Element14, ComponentLink7Description=https://www.verical.com/server-webapp/html/getDatasheet?partID=403582&src-supplier=Verical, ComponentLink7URL=https://www.verical.com/server-webapp/html/getDatasheet?partID=403582&src-supplier=Verical, Composition=Ceramic, Depth=0.8mm, Halogen Free="Halogen Free", Height=0.8mm, Lead Free="Lead Free", Length=1.6mm, Manufacturer Part Number=CC0603KRX7R9BB103, Material=Ceramic, Mount="Surface Mount", Number of Pins=2, Packaging="Tape and Reel", Pricing 1="1=0.1, 10=0.038, 100=0.0171, 500=0.01224, 1000=0.00962 (USD)", Radiation Hardening=No, REACH SVHC="No SVHC", Stock 1=8411467, Supplier 1=Digi-Key, Termination=SMD/SMT, Thickness=0.035inch, Voltage Rating=50V, Voltage Rating (DC)=50V, Width=0.031inch
D1 D2 D3 D4 D5 D6: "DIODE ARR GP 100V 215MA TO-236AB", Breakdown Voltage=75V, Forward Current=125mA, Forward Voltage=1.25V, LCSC Part Number=C2500, Manufacturer=Nexperia, Max Forward Surge Current (Ifsm)=500mA, Max Operating Temperature=150°C, Max Repetitive Reverse Voltage (Vrrm)=100V, Max Reverse Current=500nA, ComponentLink1Description=http://www.farnell.com/datasheets/953882.pdf?src-supplier=Farnell, ComponentLink1URL=http://www.farnell.com/datasheets/953882.pdf?src-supplier=Farnell, ComponentLink2Description=http://www.farnell.com/datasheets/953882.pdf?src-supplier=Newark, ComponentLink2URL=http://www.farnell.com/datasheets/953882.pdf?src-supplier=Newark, ComponentLink3Description=https://datasheet.octopart.com/BAV99%2C215-Nexperia-datasheet-10109661.pdf?src-supplier=Element14, ComponentLink3URL=https://datasheet.octopart.com/BAV99%2C215-Nexperia-datasheet-10109661.pdf?src-supplier=Element14, ComponentLink4Description=https://assets.nexperia.com/documents/data-sheet/BAV99_SER.pdf?src-supplier=Digikey, ComponentLink4URL=https://assets.nexperia.com/documents/data-sheet/BAV99_SER.pdf?src-supplier=Digikey, ComponentLink5Description=https://datasheet.octopart.com/BAV99%2C215-Nexperia-datasheet-87580883.pdf?src-supplier=Newark, ComponentLink5URL=https://datasheet.octopart.com/BAV99%2C215-Nexperia-datasheet-87580883.pdf?src-supplier=Newark, Height=1.1mm, Item Type=Diodes, Manufacturer Part Number=BAV99,215, Pins=3NUMBER, Pricing="3000=0.008, 12000=0.0077, 30000=0.0075, 75000=0.0073, 120000=0.007 (USD)", Reverse Voltage=100V, RoHS=Yes, RoHS Compliant=Yes, Stock=20217000, Supplier="Future Electronics"
D7 D12 D13 D14: "DIODE ZENER 3.3V 200MW SOD323F", Forward Voltage=1V, LCSC Part Number=C2978865, Manufacturer="ON Semiconductor / Fairchild", Max Operating Temperature=150°C, Max Power Dissipation=200mW, Max Reverse Leakage Current=4.5uA, Min Operating Temperature=-65°C, Package Quantity=1, Supplier Part Number 1=MM3Z3V3BCT-ND, Test Current=5mA, Tolerance=2%, Working Voltage=3.3V, ComponentLink1Description=http://www.onsemi.com/pub/Collateral/MM3Z9V1B-D.pdf?src-supplier=Digi-Key, ComponentLink1URL=http://www.onsemi.com/pub/Collateral/MM3Z9V1B-D.pdf?src-supplier=Digi-Key, ComponentLink2Description=http://www.mouser.com/ds/2/149/MM3Z3V3B-187166.pdf?src-supplier=Mouser, ComponentLink2URL=http://www.mouser.com/ds/2/149/MM3Z3V3B-187166.pdf?src-supplier=Mouser, ComponentLink3Description=https://www.fairchildsemi.com/datasheets/MM/MM3Z9V1B.pdf?src-supplier=Avnet, ComponentLink3URL=https://www.fairchildsemi.com/datasheets/MM/MM3Z9V1B.pdf?src-supplier=Avnet, ComponentLink4Description=http://www.farnell.com/datasheets/1706525.pdf?src-supplier=Element14, ComponentLink4URL=http://www.farnell.com/datasheets/1706525.pdf?src-supplier=Element14, Element Configuration=Single, Height=1mm, Impedance=89R, Item Type=Diode, Lead Free="Lead Free", Length=1.3mm, Manufacturer Part Number=MM3Z3V3B, Mount="Surface Mount", Number of Pins=2, Packaging="Tape and Reel", Peak Reverse Current=4.5uA, Power Dissipation=200mW, Pricing 1="1=0.22, 10=0.18, 100=0.0956, 500=0.06288, 1000=0.04276 (USD)", Radiation Hardening=No, REACH SVHC="No SVHC", Stock 1=473644, Supplier 1=Digi-Key, Voltage Tolerance=2%, Weight=0.0276g, Width=1.7mm, Zener Voltage=3.3V
D8: "TVS DIODE 3VWM SOT323-5", LCSC Part Number=C703691, Manufacturer=STMicroelectronics, ComponentLink1Description=https://datasheet.ciiva.com/23847/cd00002946-23847220.pdf?src-supplier=Newark, ComponentLink1URL=https://datasheet.ciiva.com/23847/cd00002946-23847220.pdf?src-supplier=Newark, ComponentLink2Description=https://datasheet.ciiva.com/4509/cd00002946-81943-4509940.pdf?src-supplier=Mouser, ComponentLink2URL=https://datasheet.ciiva.com/4509/cd00002946-81943-4509940.pdf?src-supplier=Mouser, ComponentLink3Description=https://datasheet.ciiva.com/5782/cd00002946-5782886.pdf?src-supplier=Farnell, ComponentLink3URL=https://datasheet.ciiva.com/5782/cd00002946-5782886.pdf?src-supplier=Farnell, ComponentLink4Description=https://datasheet.ciiva.com/338/cd00002946-338376.pdf?src-supplier=Digikey, ComponentLink4URL=https://datasheet.ciiva.com/338/cd00002946-338376.pdf?src-supplier=Digikey, ComponentLink5Description=https://datasheet.ciiva.com/338/cd00002946-338377.pdf?src-supplier=Digikey, ComponentLink5URL=https://datasheet.ciiva.com/338/cd00002946-338377.pdf?src-supplier=Digikey, ComponentLink6Description=https://datasheet.ciiva.com/338/cd00002946-338378.pdf?src-supplier=Digikey, ComponentLink6URL=https://datasheet.ciiva.com/338/cd00002946-338378.pdf?src-supplier=Digikey, Item Type="TVS Diodes", Manufacturer Part Number=ESDALC6V1W5, Pricing="3000=0.0569, 9000=0.0547, 12000=0.0774, 15000=0.0538, 30000=0.0749, 45000=0.0518, 75000=0.05 (USD)", RoHS=Yes, Stock=3000, Supplier="Future Electronics"
D9 D10 D11: "DIODE AVAL 600V 1.5A DO214AC", LCSC Part Number=C241925, Manufacturer="Vishay Semiconductors", ComponentLink1Description=https://datasheet.ciiva.com/23642/1748785-23642024.pdf?src-supplier=Newark, ComponentLink1URL=https://datasheet.ciiva.com/23642/1748785-23642024.pdf?src-supplier=Newark, ComponentLink2Description=https://datasheet.ciiva.com/4452/byg20d-205199-4452450.pdf?src-supplier=Mouser, ComponentLink2URL=https://datasheet.ciiva.com/4452/byg20d-205199-4452450.pdf?src-supplier=Mouser, ComponentLink3Description=https://datasheet.ciiva.com/5779/1795675-5779021.pdf?src-supplier=Farnell, ComponentLink3URL=https://datasheet.ciiva.com/5779/1795675-5779021.pdf?src-supplier=Farnell, ComponentLink4Description=https://datasheet.ciiva.com/1178/57063-1178161.pdf?src-supplier=Element14, ComponentLink4URL=https://datasheet.ciiva.com/1178/57063-1178161.pdf?src-supplier=Element14, ComponentLink5Description=https://datasheet.ciiva.com/1178/57063-1178162.pdf?src-supplier=Element14, ComponentLink5URL=https://datasheet.ciiva.com/1178/57063-1178162.pdf?src-supplier=Element14, Item Type=Diodes, Manufacturer Part Number=BYG20J-E3/TR, Pricing="1=0.34, 10=0.207, 50=0.207, 100=0.145, 1000=0.096, 10000=0.088 (USD)", RoHS=Yes, Stock=105610, Supplier=Mouser